# Altium PCB PCB.pcbdoc
Units mil, origin at the board's own origin, x right, y up, seen from the top; angles counter-clockwise.
Board outline 2100 x 950 mil, 2 copper layers (Top Layer, Bottom Layer), stack 62.206 mil thick; 11 components, 8 nets, 29 pads, 11 vias.
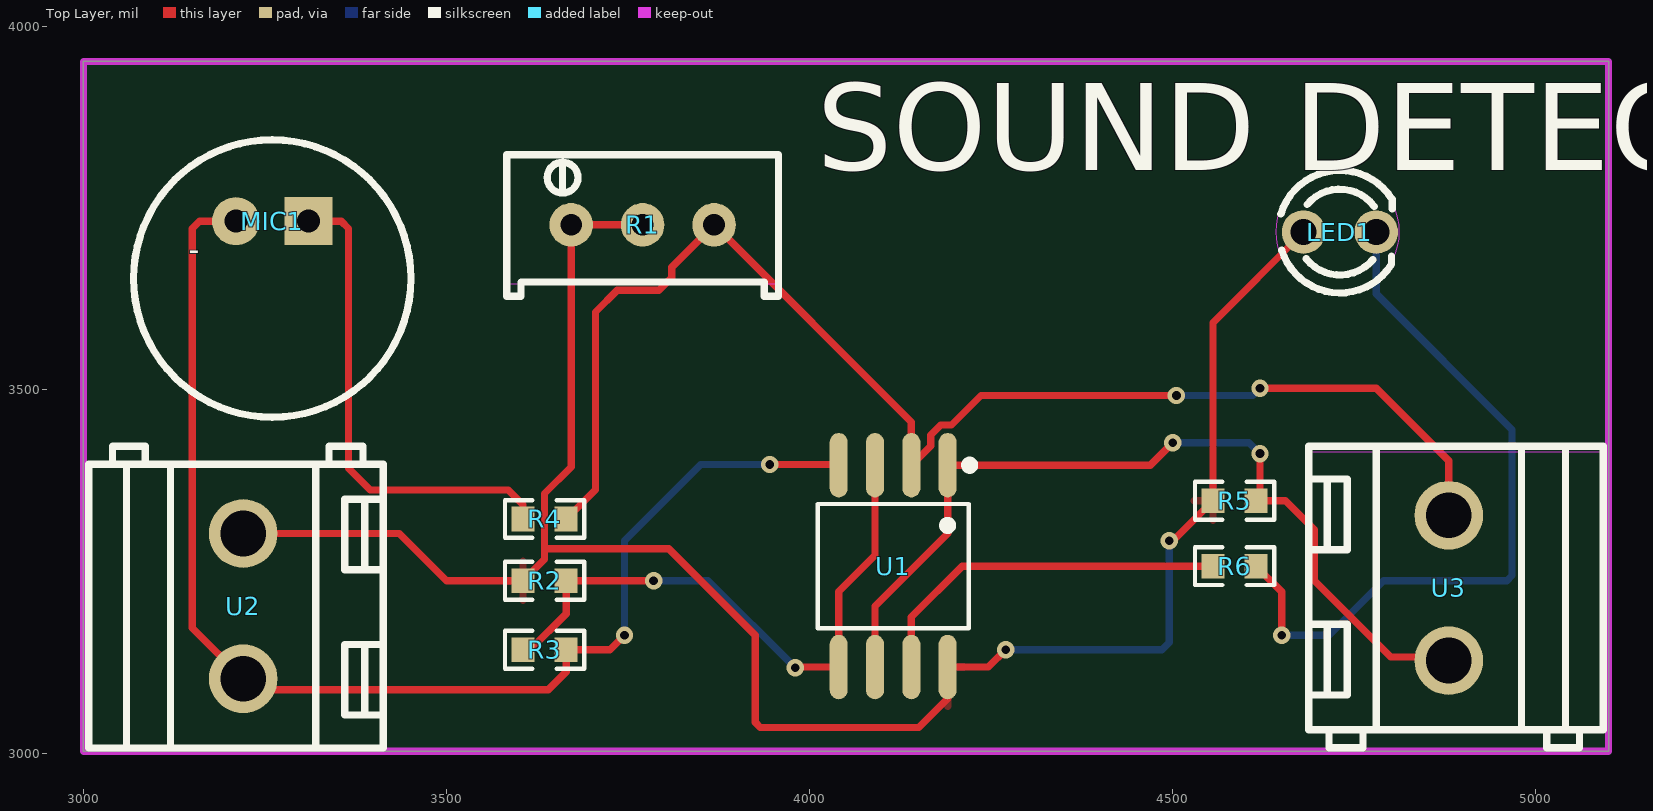
[diagram p0: Top Layer view]
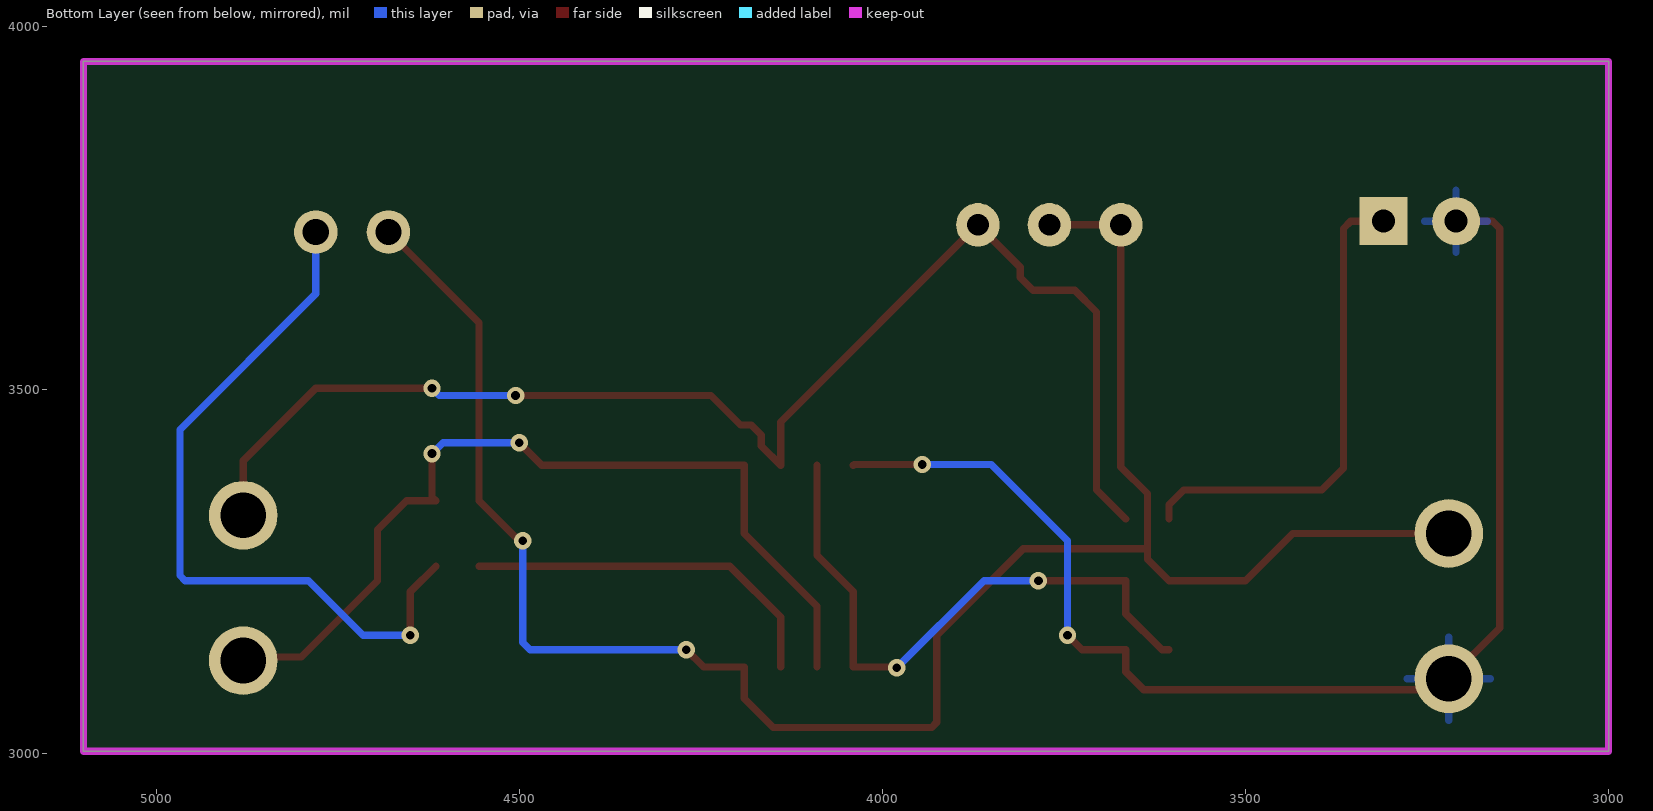
[diagram p1: Bottom Layer view, seen from below]

## Layer stack, top to bottom
Top Solder Mask Layer: solder mask 0.394, Dk 3.3
Top Layer: signal copper 1.379
Dielectric1: surface 59.449, FR4, Dk 4.5
Bottom Layer: signal copper 1.378
Bottom Solder Mask Layer: solder mask 0.394, Dk 3.3

## Board outline
3000,3952.36 3000,3002.36 5100,3002.36 5100,3952.36

## Design rules (kind name [scope] priority, off if disabled: settings)
BoardOutlineClearance copperThickness1oz [All] p0: genericclearance=10 ignorepadtopadclearanceinfootprint=FALSE except(0: Arc-SplitContinuation Track-SplitContinuation SMDPad-SplitContinuation THPad-SplitContinuation Via-SplitContinuation Fill-SplitContinuation Poly-SplitContinuation Region-SplitContinuation Text-SplitContinuation)
BoardOutlineClearance copperThickness2oz [All] p0: genericclearance=10 ignorepadtopadclearanceinfootprint=FALSE except(0: Arc-SplitContinuation Track-SplitContinuation SMDPad-SplitContinuation THPad-SplitContinuation Via-SplitContinuation Fill-SplitContinuation Poly-SplitContinuation Region-SplitContinuation Text-SplitContinuation)
BoardOutlineClearance otherClearance [All] p0: genericclearance=10 ignorepadtopadclearanceinfootprint=FALSE except(0: Arc-SplitContinuation Track-SplitContinuation SMDPad-SplitContinuation THPad-SplitContinuation Via-SplitContinuation Fill-SplitContinuation Poly-SplitContinuation Region-SplitContinuation Text-SplitContinuation)
Clearance copperThickness1oz [All] p1: gap=7 ignorepadtopadclearanceinfootprint=FALSE
Clearance copperThickness2oz [All] p1: gap=7 ignorepadtopadclearanceinfootprint=FALSE
Clearance otherClearance [All] p1: gap=7 ignorepadtopadclearanceinfootprint=FALSE
DiffPairsRouting differentialPair [All] p1: maxuncoupledlength=10 minlimit=6 maxlimit=Infinity mostfreqgap=6 toplayer_minwidth=5 toplayer_prefwidth=10 toplayer_maxwidth=100 bottomlayer_minwidth=5 bottomlayer_prefwidth=10 bottomlayer_maxwidth=100
PasteMaskExpansion pasteMaskExpansion [All] p1: expansion=0
PlaneConnect innerPlane [All] p1: planeconnectstyle=Relief reliefexpansion=20 reliefentries=4 reliefconductorwidth=10 reliefairgap=10
PolygonConnect copperRegion [All] p1: connectstyle=Relief reliefentries=4 reliefconductorwidth=10 polygonreliefangle="90 Angle" airgapwidth=10
RoutingVias viaSize [All] p1: viastyle="Through Hole" holewidth=12.0078 minholewidth=11.811 maxholewidth=248.0314 width=12.0078 minwidth=11.811 maxwidth=248.0314
SolderMaskExpansion solderMaskExpansion [IsVia] p1: useseparateexpansions=TRUE expansion=-1000 expansionbottom=-1000
SolderMaskExpansion solderMaskExpansion [All] p2: useseparateexpansions=TRUE expansion=2 expansionbottom=2
Width copperThickness1oz [All] p1: maxlimit=100 minlimit=5 preferedwidth=10
Width copperThickness2oz [All] p1: maxlimit=100 minlimit=8 preferedwidth=10

## Components (designator, comment, footprint, x,y, rotation, side; value= is the part's Value field where it differs from the comment)
LED1 "" LED-TH_BD3.0-P2.54-FD 4730,3717.36 r0 top
MIC1 "GMI9767P-52DB" MIC-TH_BD9.7-P2.54-D0.8-L-FD 3260,3732.36 r180 top
R1 "10kΩ" RES-ADJ-TH_3P-L10.0-W10.0-P2.50-L 3770,3727.36 r0 top
R2 "10kΩ" R0603 3635,3237.36 r0 top
R3 "10kΩ" R0603 3635,3142.36 r0 top
R4 "150Ω" R0603 3635,3322.36 r0 top
R5 "10kΩ" R0603 4585,3347.36 r0 top
R6 "10kΩ" R0603 4585,3257.36 r180 top
U1 "LM393PSR" SOIC-8_L5.3-W5.3-P1.27-LS8.0-BL 4115,3257.36 r180 top
U2 "DB128V-5.0-2P-GY-S" CONN-TH_DB128V-5.0-2P-XX 3220,3202.36 r270 top
U3 "DB128V-5.0-2P-GY-S" CONN-TH_DB128V-5.0-2P-XX 4880,3227.36 r90 top

## Footprints (in the part's own frame and the unit in brackets; to place one, negate y for a bottom-side part, rotate by r counter-clockwise, add the part's x,y. Pads: shape width x height; smd on the part's side, far side on the other; paste and mask are expansions set on the pad)
CONN-TH_DB128V-5.0-2P-XX [mm]
  round 2.4 hole 1.6: 1(-2.54,0) 2(2.54,0)
  silkscreen extent -5.59,-5.4 4.96,4.9
LED-TH_BD3.0-P2.54-FD [mil]
  round 60 hole 36 paste+0 mask+1.97: 1(-50,0) 2(50,0)
  silkscreen extent -81,-84 72,85
MIC-TH_BD9.7-P2.54-D0.8-L-FD [mil]
  rect 66x66 hole 31.5: 1(-50,0)
  round 66 hole 31.5: 2(50,0)
  silkscreen extent -191,-112 191,270
R0603 [mil]
  rect 31.75x34.02 smd paste-3937.01 mask+2: 1(-29.66,0) 2(29.66,0)
  silkscreen extent -55,-26 55,26
RES-ADJ-TH_3P-L10.0-W10.0-P2.50-L [mil]
  round 60 hole 30: 1(-98.43,0) 2(0,0) 3(98.43,0)
  silkscreen extent -187,-98 187,96
SOIC-8_L5.3-W5.3-P1.27-LS8.0-BL [mm]
  oval 0.63x2.25 smd: 1(-1.905,-3.53) 2(-0.635,-3.53) 3(0.635,-3.53) 4(1.905,-3.53) 5(1.905,3.53) 6(0.635,3.53) 7(-0.635,3.53) 8(-1.905,3.53)
  silkscreen extent -2.82,-3.68 2.64,2.18

## Via types
v1: diameter 24.02, hole 12, Top Layer to Bottom Layer, 11 vias

## Nets (pads, with @x,y where several pads share a name; then routed paths per layer and width w, separated by ;. In a path a pad name is that pad's centre, name@x,y a point inside that pad or via, vN(x,y) a via of type N, cw(c..) or ccw(c..) an arc to the next point about the centre after c; other vN are vias at no path point)
3V3: LED1.1 R1.1 R1.2 R2.1 R5.1 U1.8 U2.1 | length 2778.9
  Top Layer w10: U2.1 3435,3302.36 3500,3237.36 R2.1 3635,3267.02 3635,3281.42 ; R1.2 R1.1 3671.57,3393.94 3635,3357.36 3635,3281.42 ; v1(4270,3142.36) 4246.02,3118.38 U1.8 4190,3075.29 4150,3035.29 3932.07,3035.29 3925,3042.36 3925,3162.36 3805.94,3281.42 3635,3281.42 ; v1(4495,3292.36) 4500.34,3292.36 R5.1 4555.34,3592.7 LED1.1
  Bottom Layer w10: v1(4270,3142.36) 4485,3142.36 4495,3152.36 v1(4495,3292.36)
$1N3: LED1.2 R6.1 | length 1011.1
  Top Layer w10: R6.1 4650,3222.02 v1(4650,3162.36)
  Bottom Layer w10: v1(4650,3162.36) 4715,3162.36 4790,3237.36 4960,3237.36 4967.07,3244.43 4967.07,3445.29 4780,3632.36 LED1.2
$1N4: MIC1.1 R4.1 | length 670
  Top Layer w10: MIC1.1 3355,3732.36 3365,3722.36 3365,3392.36 3395,3362.36 3585,3362.36 3605.34,3342.02 R4.1
$1N5: R2.2 R3.1 U1.3 U1.5 | length 849.4
  Top Layer w10: R3.1 3615,3142.36 3664.66,3192.02 R2.2 v1(3785,3237.36) ; v1(3980,3117.36) 3981.02,3118.38 U1.5 4040,3222.36 4090,3272.36 U1.3
  Bottom Layer w10: v1(3785,3237.36) 3860,3237.36 v1(3980,3117.36)
$1N7: R6.2 U1.7 | length 513.3
  Top Layer w10: U1.7 4140,3187.36 4210,3257.36 R6.2
AOUT: R1.3 R4.2 U1.2 U3.2 | length 1875.7
  Top Layer w10: R4.2 3705,3362.7 3705,3607.36 3735,3637.36 3792.57,3637.36 3810,3654.79 3810,3668.94 R1.3 4140,3455.79 U1.2 4166.61,3422.96 4166.61,3437.92 4180.31,3451.62 4195.28,3451.62 4236.02,3492.36 v1(4505,3492.36) ; v1(4620,3502.36) 4780,3502.36 4880,3402.36 U3.2
  Bottom Layer w10: v1(4505,3492.36) 4610,3492.36 v1(4620,3502.36)
DOUT: R5.2 U1.1 U1.6 U3.1 | length 1233.1
  Top Layer w10: U1.6 4090,3202.36 4190,3302.36 U1.1 4468.98,3396.34 v1(4500,3427.36) ; v1(4620,3412.36) 4620,3352.7 R5.2 4655,3347.36 4695,3307.36 4695,3237.36 4800,3132.36 4875,3132.36 U3.1
  Bottom Layer w10: v1(4500,3427.36) 4605,3427.36 v1(4620,3412.36)
GND: MIC1.2 R3.2 U1.4 U2.2 | length 1762.1
  Top Layer w10: MIC1.2 3160,3732.36 3150,3722.36 3150,3172.36 U2.2 3235,3087.36 3640,3087.36 3664.66,3112.02 R3.2 3725,3142.36 v1(3745,3162.36) ; v1(3945,3397.36) 4038.98,3397.36 U1.4
  Bottom Layer w10: v1(3745,3162.36) 3745,3292.36 3850,3397.36 v1(3945,3397.36)

## Polygon pours and split planes (outlines as drawn)
GND on Bottom Layer (solid, remove dead copper, pour order 2): 3000,3952.36 3000,3007.36 5089.69,3007.36 5089.69,3952.36
3V3 on Top Layer (solid, remove dead copper, pour order 0): 3000,3952.36 3000,3002.36 5100,3002.36 5100,3952.36

## Keep-outs
Top Layer:
  region: 4011.11,3343.05 4011.11,3171.68 4218.89,3171.68 4218.89,3343.05
  region: 3451,3653.36 cw(c3260,3653.36) 3069,3653.36 cw(c3260,3653.36)
  region: 3007.4,3397.64 3007.4,3007.09 3412.91,3007.09 3412.91,3397.64
  region: 4687.09,3414.27 4687.09,3032.09 5092.6,3032.09 5092.6,3414.27
  region: 3582.99,3823.82 3582.99,3645.9 3957.22,3645.9 3957.22,3823.82
  region: 4811.33,3717.95 cw(c4726.87,3717.95) 4642.4,3717.95 cw(c4726.87,3717.95)
Board Outline Layer:
  the board outline again, w10

## Silkscreen, mask and mechanical layers (free items; w line width, h text height)
Top Silkscreen Layer:
  text "SOUND DETECTOR" at 4010,3802.36 h120

## Text inside footprints (layer, text, board x,y; h text height)
MIC1: Top Silkscreen Layer "-" at 3145,3678.36 h30